# Altium PCB GR_Propu.PcbDoc
Units mil, origin at the board's own origin, x right, y up, seen from the top; angles counter-clockwise.
Board outline 3110.24 x 1811.02 mil, 2 copper layers (Top Layer, Bottom Layer); 47 components, 34 nets, 150 pads, 11 vias.
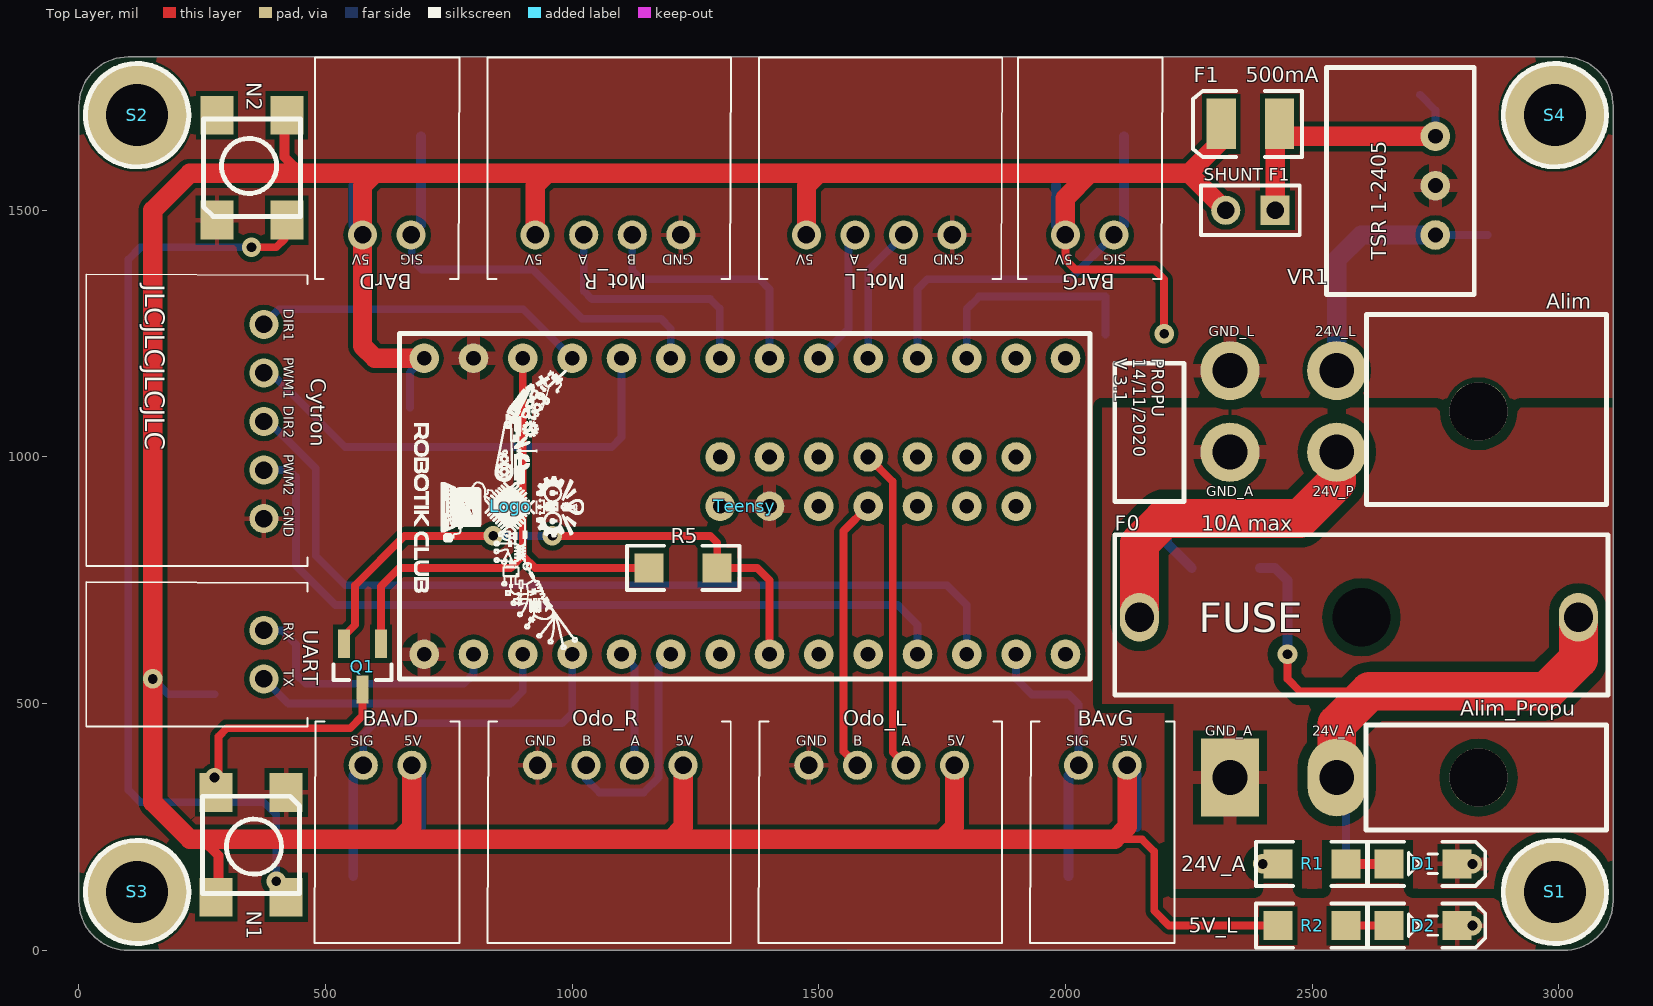
[diagram p0: Top Layer view]
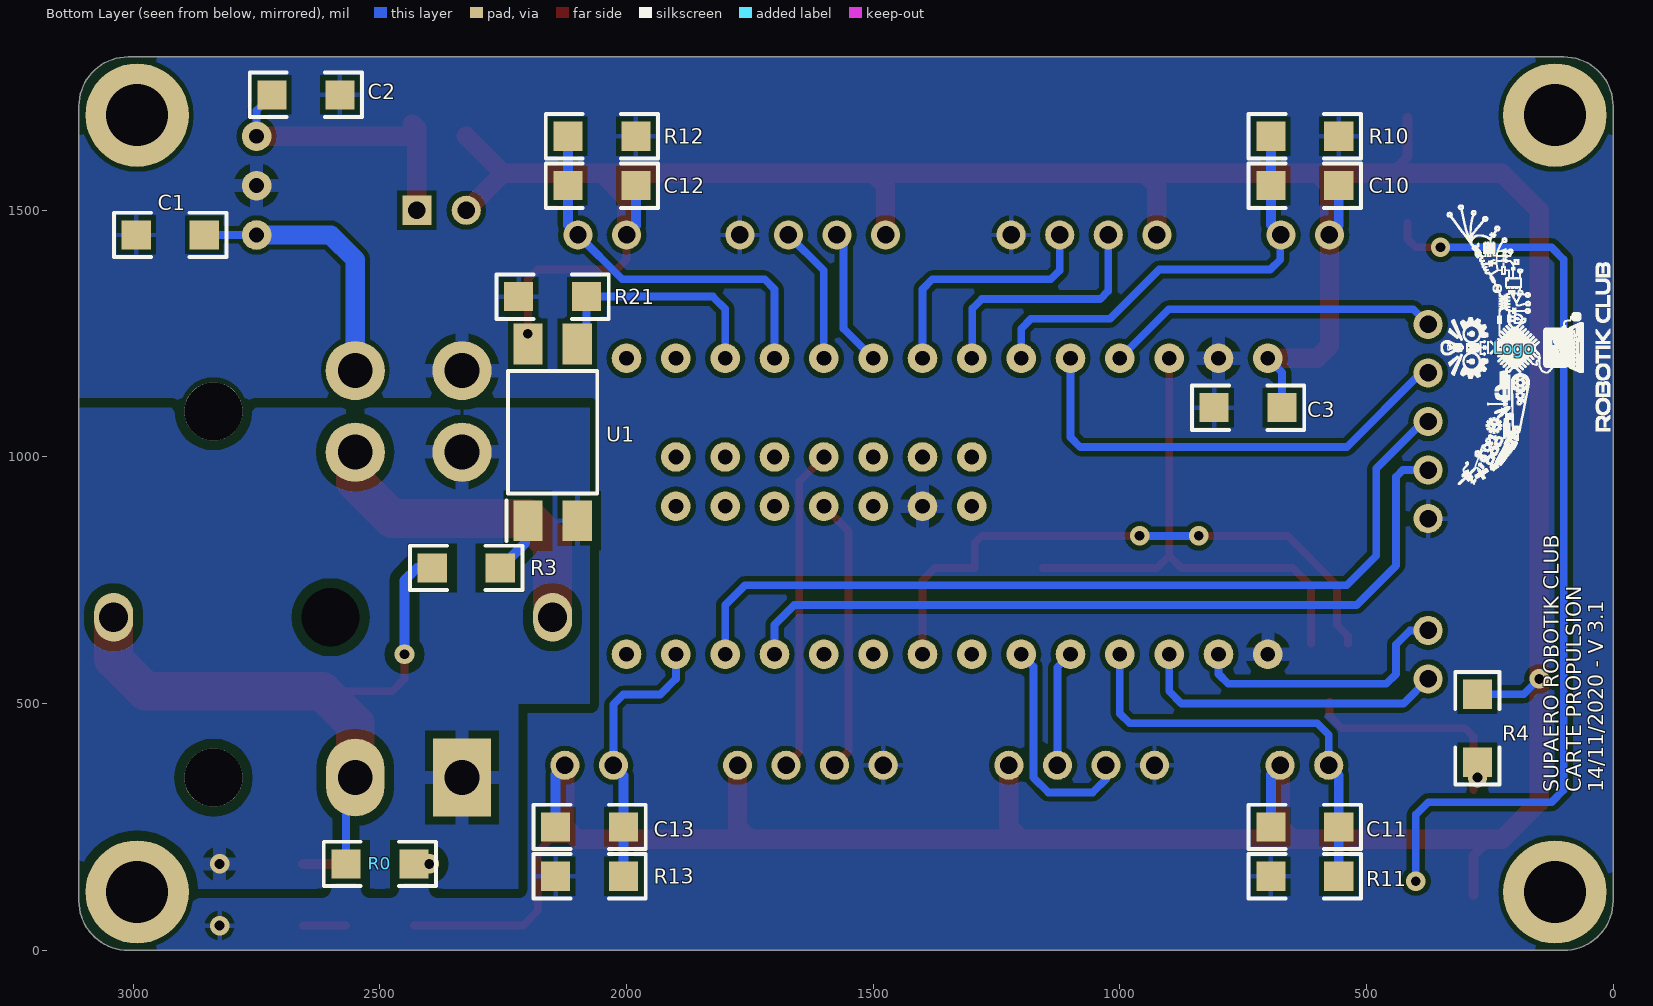
[diagram p1: Bottom Layer view, seen from below]

## Layer stack, top to bottom
Top Solder: solder mask 0.4, Solder Resist, Dk 3.5
Top Layer: signal copper 1.4
Dielectric 1: dielectric 12.6, FR-4, Dk 4.8
Bottom Layer: signal copper 1.4
Bottom Solder: solder mask 0.4, Solder Resist, Dk 3.5

## Board outline
118.11,0 100,0 cw(c100,100) 0,100 0,1259.84 0,1711.02 cw(c100,1711.02) 100,1811.02 826.77,1811.02 3010.24,1811.02 cw(c3010.24,1711.02) 3110.24,1711.02 3110.24,1181.1 3110.24,100 cw(c3010.24,100) 3010.24,0 1929.13,0

## Design rules (kind name [scope] priority, off if disabled: settings)
Clearance Clearance_GND_A [InNet('GND_A')] p1: gap=10 except(19.68: Arc-Poly Track-Poly SMDPad-Poly THPad-Poly Via-Poly Fill-Poly Poly-Poly Poly-Region Poly-Text)
Clearance [All] p2: gap=10
ComponentClearance Logo [HasFootprint('Logo_lowres')] p1: gap=0 collisioncheckmode=3 verticalgap=0 showdistances=FALSE
ComponentClearance "CMS Fuse" [HasFootprint('3.5X2.8X1.9')] p2: gap=0 collisioncheckmode=3 verticalgap=0 showdistances=FALSE
ComponentClearance [All] p3: gap=10 collisioncheckmode=3 verticalgap=10 showdistances=FALSE
HoleSize [All] p1: absolutevalues=TRUE maxlimit=125.98 minlimit=1 maxpercent=80.000 minpercent=20.000
PolygonConnect GND_A_Photo [HasFootprint('SOP254P1016X385-4N')] p1: connectstyle=Relief reliefconductorwidth=10 reliefentries=4 polygonreliefangle="90 Angle" airgapwidth=10
PolygonConnect GND_L_Power [HasFootprint('Molex_MiniFitJr_2x2H') Or HasFootprint('TRS') Or HasFootprint('Teensy')] p2: connectstyle=Relief reliefconductorwidth=27.56 reliefentries=4 polygonreliefangle="90 Angle" airgapwidth=15.75
PolygonConnect GND_A_CMS [HasFootprint('KP-3216SEC')] p3: connectstyle=Relief reliefconductorwidth=10 reliefentries=4 polygonreliefangle="90 Angle" airgapwidth=10
PolygonConnect GND_L [InNet('GND_L')] p4: connectstyle=Relief reliefconductorwidth=10 reliefentries=4 polygonreliefangle="90 Angle" airgapwidth=10
PolygonConnect GND_A [InNet('GND_A')] p5: connectstyle=Relief reliefconductorwidth=27.56 reliefentries=4 polygonreliefangle="90 Angle" airgapwidth=15.75
RoutingVias [All] p1: holewidth=28 width=50 viastyle="Through Hole" minholewidth=28 minwidth=50 maxholewidth=28 maxwidth=50
SilkToSilkClearance [All] p1 off: silktosilkclearance=10
SolderMaskExpansion [All] p1: expansion=4
Width [All] p1: maxlimit=78.74 minlimit=10 preferedwidth=15.75
27 further rules are at their usual default settings.

## Components (designator, comment, footprint, x,y, rotation, side; value= is the part's Value field where it differs from the comment)
Alim "MinifitJr 2X2H" MOLEX_MINIFITJR_2X2H 2550,1175 r90 top
Alim_Propu "MinifitJR 2H" Molex_MiniFitJr_2x1H 2550,350 r0 top
BArD "JST XH 2" S2B-XH-A 575,1450 r0 top
BArG "JST XH 2" S2B-XH-A 2000,1450 r0 top
BAvD "JST XH 2" S2B-XH-A 675,375 r180 top
BAvG "JST XH 2" S2B-XH-A 2125,375 r180 top
C1 "" "Capacitor 1206" 2925,1450 r180 bottom
C2 "(Optinal)" "Capacitor 1206" 2650,1734.06 r0 bottom
C3 "(Optinal)" "Capacitor 1206" 740,1100 r180 bottom
C10 "Cap" "Capacitor 1206" 625,1550 r180 bottom
C11 "Cap" "Capacitor 1206" 625,250 r0 bottom
C12 "Cap" "Capacitor 1206" 2050,1550 r180 bottom
C13 "Cap" "Capacitor 1206" 2075,250 r0 bottom
Cytron "JST XH 5" S5B-XH-A 375,875 r90 top
D1 "A" KP-3216SEC 2725,175 r0 top
D2 "L" KP-3216SEC 2725,50 r0 top
F0 "10A max" Fuse 2150,675 r0 top
F1 "500mA" 3.5X2.8X1.9 2375,1675 r180 top
Logo "Comment" Logo_lowres 200,1220 r90 bottom
Logo "Comment" Logo_lowres 875,900 r270 top
Mot_L "JST XH 4" S4B-XH-A 1475,1450 r0 top
Mot_R "JST XH 4" S4B-XH-A 925,1450 r0 top
N1 "WS2812C" WS2812C 420,320 r270 top
N2 "WS2812C" WS2812C 280,1480 r90 top
Odo_L "JST XH 4" S4B-XH-A 1775,375 r180 top
Odo_R "JST XH 4" S4B-XH-A 1225,375 r180 top
Q1 "MOSFET-N" SOT23_M 575,575 r270 top
R0 "Res2" "Resistor 1206" 2500,175 r180 bottom
R1 "Res2" "Resistor 1206" 2500,175 r0 top
R2 "Res2" "Resistor 1206" 2500,50 r0 top
R3 "Res2" "Resistor 1206" 2325,775 r0 bottom
R4 "Res2" "Resistor 1206" 275,450 r90 bottom
R5 "Res2" "Resistor 1206" 1225,775 r180 top
R10 "Res2" "Resistor 1206" 625,1650 r180 bottom
R11 "Res2" "Resistor 1206" 625,150 r0 bottom
R12 "Res2" "Resistor 1206" 2050,1650 r180 bottom
R13 "Res2" "Resistor 1206" 2075,150 r0 bottom
R21 "Res2" "Resistor 1206" 2150,1325 r180 bottom
S1 "Screw M3" "Screw M3" 2992.13,118.11 r0 top
S2 "Screw M3" "Screw M3" 118.11,1692.91 r0 top
S3 "Screw M3" "Screw M3" 118.11,118.11 r0 top
S4 "Screw M3" "Screw M3" 2992.13,1692.91 r0 top
"SHUNT F1" "Header 2" HDR1X2 2425,1500 r180 top
Teensy "Teensy 3.2" TEENSY 1500,500 r90 top locked
U1 "FOD817S" SOP254P1016X385-4N 2150,1050 r90 bottom
UART "JST XH 2" S2B-XH-A 375,550 r90 top
VR1 "TSR 1-2405" TRS 2750,1450 r270 top

## Footprints (in the part's own frame and the unit in brackets; to place one, negate y for a bottom-side part, rotate by r counter-clockwise, add the part's x,y. Pads: shape width x height; smd on the part's side, far side on the other; paste and mask are expansions set on the pad)
3.5X2.8X1.9 [mm] "SM LED; 2 C-Bend Leads; Body 3.5 x 2.8 x 1.9 mm, inc leads (LxWxH typ)"
  rect 1.5x2.6 smd: 1(-1.5,0) 2(1.5,0)
  silkscreen extent -2.65,-1.7 2.95,1.7
"Capacitor 1206" [mm]
  rect 1.5x1.5 smd: 1(-1.75,0) 2(1.75,0)
  silkscreen extent -2.89,-1.14 2.89,1.14, body extent -1.98,-0.99 1.98,0.96, height 1.3
Fuse [mm] "Porte-fusible monté sur circuit 10 (UL) A, 6.3 (VDE) A, fusible Cartouche, 893-0574"
  round 2 hole 3: 0(11.43,0)
  oval 2x2.5 hole 1.5: 1(0,0) 2(22.6,0)
  silkscreen extent -1.27,-4 24.13,4.25, body extent -1.27,-4.29 24.13,4.29, height 11.41
HDR1X2 [mm] "Connector; Header; 2 Position"
  rect 1.5x1.5 hole 0.9: 1(0,0)
  round 1.5 hole 0.9: 2(2.54,0)
  silkscreen extent -1.27,-1.27 3.81,1.27
KP-3216SEC [mm]
  rect 1.5x1.5 smd: 1(-1.75,0) 2(1.75,0)
  silkscreen extent -2.89,-1.14 3.2,1.14, body extent -1.7,-0.79 1.5,0.81, height 1.1
Logo_lowres [mil]
  silkscreen extent -276,-194 291,148
Molex_MiniFitJr_2x1H [mm] "Connecteur Molex 2"
  rect 3x4 hole 1.8: 1(-5.5,0)
  oval 3x4 hole 1.8: 2(0,0)
  round 3 hole 3 unplated: 3(7.3,0)
  silkscreen extent 1.5,-2.7 13.9,2.7, body extent -6.03,-2.7 13.9,3.1, height 11.01
MOLEX_MINIFITJR_2X2H [mm] "MOLEX_MINIFITJR_3X2, 39-30-1060"
  round 3.048 hole 1.8: 1(-4.2,5.5) 2(-4.2,0) 3(0,5.5) 4(0,0)
  round 3 hole 3 unplated: 10(-2.1,-7.3)
  silkscreen extent -6.9,-13.9 2.9,-1.52, body extent -6.88,-13.9 3.12,6.03, height 11.4
"Resistor 1206" [mm]
  rect 1.5x1.5 smd: 1(-1.75,0) 2(1.75,0)
  silkscreen extent -2.89,-1.14 2.89,1.14, body extent -1.98,-0.95 1.98,0.93, height 0.55
S2B-XH-A [mm]
  round 1.5 hole 0.9: 1(0,0) 2(2.5,0)
  silkscreen extent -2.45,-2.26 5,9.14, body extent -2.41,-2.32 4.99,9.18, height 6.15
S4B-XH-A [mm]
  round 1.5 hole 0.9: 1(0,0) 2(2.5,0) 3(5,0) 4(7.5,0)
  silkscreen extent -2.45,-2.26 10.08,9.14, body extent -2.44,-2.32 9.96,9.18, height 6.15
S5B-XH-A [mm]
  round 1.5 hole 0.9: 1(0,0) 2(2.5,0) 3(5,0) 4(7.5,0) 5(10,0)
  silkscreen extent -2.45,-2.26 12.58,9.14, body extent -2.45,-2.3 12.45,9.2, height 6.15
"Screw M3" [mm] "M3 iso Screw"
  round 5.32 hole 3.2 unplated: 0(0,0)
  silkscreen extent -2.66,-2.66 2.66,2.66
SOP254P1016X385-4N [mm]
  rect 2.1x1.5 smd: 1(-4.55,1.27) 2(-4.55,-1.27) 3(4.55,-1.27) 4(4.55,1.27)
  silkscreen extent -5.6,-2.3 3.15,2.37, body extent -3.53,-1.4 3.48,1.44, height 2.21
SOT23_M [mm] "SOT23, 3-Leads, Body 2.9x1.3mm, Pitch 0.95mm, Lead Span 2.3mm - Reverse Pinning, IPC Low Density"
  rect 1.45x0.6 smd: 1(1.175,0) 2(-1.175,-0.95) 3(-1.175,0.95)
  silkscreen extent -0.1,-1.5 0.7,1.5, body extent -0.7,-1.5 0.7,1.5, height 1.1
TEENSY [mil] "Teensy 3.2"
  round 60 hole 30: 0(100,700) 1(100,600) 2(100,500) 3(100,400) 4(100,300) 5(100,200) 6(100,100) 7(100,0) 8(100,-100) 9(100,-200) 10(100,-300) 11(100,-400) 12(100,-500) 13(700,-500) 14(700,-400) 15(700,-300) 16(700,-200) 17(700,-100) 18(700,0) 19(700,100) 20(700,200) 21(700,300) 22(700,400) 23(700,500) 24(400,0) 25(400,-100) 26(400,-200) 27(400,-300) 28(400,-400) 29(500,-400) 30(500,-300) 31(500,-200) 32(500,-100) 33(500,0) 36(400,200) 37(500,200) 39(500,100) 40(400,100) 41(700,600) 42(700,700) 43(700,800) 44(100,800)
  silkscreen extent 50,-550 750,850, body extent 48,-550 752,907, height 505
TRS [mil]
  round 60 hole 30: 1(0,0) 2(-100,0) 3(-200,0)
  silkscreen extent -340,-220 121,79, body extent -341,-218 120,80, height 398
WS2812C [mm]
  rect 2x1.7 smd: 1(5.4,-3.6) 2(5.4,0) 3(0,0) 4(0,-3.6)
  silkscreen extent 0.2,-4.3 5.2,0.7, body extent 0.19,-4.33 5.19,0.67, height 2

## Part data
Alim: library part "Header 2X2H", "Header, 2-Pin, Dual row, Right Angle"
Alim_Propu BArD BArG BAvD BAvG UART: library part "Header 2", "Header, 2-Pin"
C1 C2 C3: library part Cap, "Capacitor"
C10 C11 C12 C13: "Capacitor"
Cytron: library part "Header 5", "Header, 5-Pin"
D1 D2: library part LED2, "Typical RED, GREEN, YELLOW, AMBER GaAs LED"
F0: library part "Fuse 2", "Main Fuse"
F1: library part "Fuse 2", "Fuse"
Mot_L Mot_R Odo_L Odo_R: library part "Header 4H", "Molex SPOX 4x1H"
N1 N2: "Intelligent control LED"
Q1: "N-Channel MOSFET"
R0 R1 R2 R3 R4 R5 R10 R11 R12 R13 R21: "Resistor"
"SHUNT F1": "Header, 2-Pin"
Teensy: library part teensy3.2
U1: library part Optoisolator1, "4-Pin Phototransistor Optocoupler"
VR1: library part "Volt Reg", "Voltage Regulator"

## Via types
v1: diameter 39.37, hole 19.68, Top Layer to Bottom Layer, 10 vias
v2: diameter 40, hole 20, Top Layer to Bottom Layer, 1 vias

## Nets (pads, with @x,y where several pads share a name; then routed paths per layer and width w, separated by ;. In a path a pad name is that pad's centre, name@x,y a point inside that pad or via, vN(x,y) a via of type N, cw(c..) or ccw(c..) an arc to the next point about the centre after c; other vN are vias at no path point)
3V_L: Q1.3 R5.2 Teensy.41 | length 1096.2
  Top Layer w15.75: Q1.3 612.4,737.6 649.8,775 875,775 900,800 ; Teensy.41 900,800 ; R5.2 925,775 900,800
5V_L: "SHUNT F1.2" BArD.1 BArG.1 BAvD.1 BAvG.1 C3.2 C10.2 C11.2 C12.2 C13.2 F1.2 Mot_L.1 Mot_R.1 N1.1 N2.1 Odo_L.1 Odo_R.1 R2.1 R4.2 Teensy.43 U1.4 | length 8912.2
  Top Layer w15.75: BArG.1 2000,1400 2020,1380 2180,1380 2200,1360 v1(2200,1250) ; 2100,225 2155,225 2180,200 2180,80 2210,50 R2.1
  Top Layer w20: 250,225 283.27,191.73 N1.1@283.27,112.4 ; N2.1@416.73,1687.6 416.73,1608.27 450,1575
  Top Layer w39.37: BAvD.1 675,250 650,225 ; Teensy.43 600,1200 575,1225 BArD.1 575,1550 600,1575 ; Mot_R.1 925,1550 950,1575 ; Odo_R.1 1225,250 1200,225 ; Mot_L.1 1475,1550 1500,1575 ; Odo_L.1 1775,250 1750,225 ; BArG.1 2000,1525 2050,1575 ; BAvG.1 2125,250 2100,225 1750,225 ; 2325,1500 2250,1575 ; F1.2@2325,1650 2250,1575 ; 600,1575 450,1575 225,1575 150,1500 150,300 225,225 250,225 650,225 ; 600,1575 950,1575 ; 650,225 1200,225 ; 950,1575 1500,1575 ; 1200,225 1750,225 ; 1500,1575 2050,1575 ; 2050,1575 2250,1575
  Bottom Layer w15.75: v1(150,550) 181.1,518.9 R4.2 ; C3.2 671.1,1171.1 Teensy.43
  Bottom Layer w20: C10.2 556.1,1468.9 BArD.1 ; BAvD.1 693.9,356.1 C11.2 ; C12.2 1981.1,1468.9 BArG.1 ; BAvG.1 2143.9,356.1 C13.2
24V_A: Alim_Propu.2 F0.2 R0.1 R3.2 | length 1420.1
  Top Layer w15.75: v2(2450,600) 2450,550 2475,525 2616.54,525 ; Alim_Propu.2@2550,293.9 Alim_Propu.2
  Top Layer w78.74: Alim_Propu.2 2550,458.46 2616.54,525 2975,525 3039.76,589.76 F0.2
  Bottom Layer w15.75: Alim_Propu.2 2568.9,331.1 R0.1
  Bottom Layer w20: R3.2 2425,775 2450,750 v2(2450,600)
24V_L: Alim.4 C1.2 VR1.1 | length 551.8
  Bottom Layer w15.75: VR1.1 C1.2
  Bottom Layer w39.37: Alim.4 2550,1400 2600,1450 VR1.1
24V_P: Alim.2 F0.1 | length 661.4
  Top Layer w78.74: F0.1 2150,825 2200,875 2475,875 2550,950 Alim.2
GND_A: Alim.1 Alim_Propu.1 D1.2 U1.2
  other v1: 2825,175
GND_L: Alim.3 C1.1 C2.1 C3.1 Cytron.1 D2.2 Mot_L.4 Mot_R.4 N1.3 N2.3 Odo_L.4 Odo_R.4 R10.2 R11.2 R12.2 R13.2 R21.1 Teensy.40 Teensy.42 Teensy.44 VR1.2
  other v1: 2825,50
NetC2_2: "SHUNT F1.1" C2.2 F1.1 VR1.3 | length 600.7
  Top Layer w39.37: 2425,1500 2425,1665.94 F1.1 ; F1.1@2425,1650 VR1.3
  Bottom Layer w15.75: C2.2 2750,1702.95 VR1.3
NetD1_1: D1.1 R1.2 | length 87.2
  Top Layer w20: R1.2 D1.1
NetD2_1: D2.1 R2.2 | length 87.2
  Top Layer w15.75: R2.2 D2.1
NetN1_2: N1.2 N2.4 | length 1898
  Top Layer w15.75: v1(350,1425) 400,1425 416.73,1441.73 N2.4@416.73,1475
  Bottom Layer w15.75: v1(350,1425) 125,1425 100,1400 100,325 125,300 375,300 400,275 v1(400,140)
NetN1_4: N1.4 Q1.1 R4.1 | length 446
  Top Layer w15.75: N1.4@283.27,325 283.27,433.27 300,450 550,450 575,475 Q1.1@575,503.74
  other v1: 275,350
NetR0_2: R0.2 R1.1
  other v1: 2400,175
NetR3_1: R3.1 U1.1 | length 119.1
  Bottom Layer w20: U1.1 2206.1,864.76 2206.1,825 R3.1
T_BUMP_ARD: BArD.2 C10.1 R10.1 Teensy.21 | length 902.1
  Bottom Layer w15.75: BArD.2 675,1448.43 675,1400 695,1380 920,1380 1020,1280 1180,1280 1200,1260 Teensy.21
  Bottom Layer w20: BArD.2 693.9,1470.47 C10.1 R10.1
T_BUMP_ARG: BArG.2 C12.1 R12.1 Teensy.16 | length 792.5
  Bottom Layer w15.75: Teensy.16 1700,1340 1720,1360 2008.43,1360 BArG.2
  Bottom Layer w20: BArG.2 2118.9,1470.47 C12.1 R12.1
T_BUMP_AVD: BAvD.2 C11.1 R11.1 Teensy.2 | length 856.5
  Bottom Layer w15.75: BAvD.2 576.57,436.57 600,460 980,460 1000,480 Teensy.2
  Bottom Layer w20: R11.1 C11.1 556.1,354.53 BAvD.2
T_BUMP_AVG: BAvG.2 C13.1 R13.1 Teensy.11 | length 554.8
  Bottom Layer w15.75: Teensy.11 1900,550 1931.64,518.36 2006.64,518.36 2026.57,498.43 BAvG.2
  Bottom Layer w20: R13.1 C13.1 2006.1,354.53 BAvG.2
T_DIR_1: Cytron.5 Teensy.23 | length 678.7
  Bottom Layer w15.75: Cytron.5 405.51,1299.21 900.79,1299.21 Teensy.23
T_DIR_2: Cytron.3 Teensy.10 | length 1782.5
  Bottom Layer w15.75: Cytron.3 384.84,1071.85 480,976.69 480,800 540,740 1760,740 1800,700 Teensy.10
T_MOT_L_A: Mot_L.2 Teensy.18 | length 280.4
  Bottom Layer w15.75: Teensy.18 1560,1260 1560,1436.57 Mot_L.2
T_MOT_L_B: Mot_L.3 Teensy.17 | length 279.8
  Bottom Layer w15.75: Teensy.17 1600,1378.15 Mot_L.3
T_MOT_R_A: Mot_R.2 Teensy.20 | length 504.1
  Bottom Layer w15.75: Mot_R.2 1023.43,1336.57 1040,1320 1280,1320 1299.25,1300.75 Teensy.20@1299.25,1200.75
T_MOT_R_B: Mot_R.3 Teensy.19 | length 505.8
  Bottom Layer w15.75: Mot_R.3 1121.85,1378.15 1140,1360 1380,1360 1400,1340 Teensy.19
T_NEOPIXEL: Q1.2 R5.1 Teensy.6 | length 1226.7
  Top Layer w15.75: Q1.2 537.6,637.6 560,660 560,740 660,840 v1(840,840) ; v1(960,840) 1280,840 1293.9,826.1 R5.1 1375,775 1400,750 Teensy.6
  Bottom Layer w15.75: v1(840,840) v1(960,840)
T_ODO_L_A: Odo_L.2 Teensy.32 | length 656.7
  Top Layer w15.75: Teensy.32 1650,950 1650,401.57 Odo_L.2
T_ODO_L_B: Odo_L.3 Teensy.25 | length 557.4
  Top Layer w15.75: Odo_L.3 1550,403.15 1550,850 Teensy.25
T_ODO_R_A: Odo_R.2 Teensy.3 | length 236
  Bottom Layer w15.75: Teensy.3 1126.57,573.43 Odo_R.2
T_ODO_R_B: Odo_R.3 Teensy.4 | length 458.9
  Bottom Layer w15.75: Odo_R.3 1028.15,346.85 1055,320 1145,320 1175,350 1175,575 Teensy.4
T_PWM_1: Cytron.4 Teensy.22 | length 955.5
  Bottom Layer w15.75: Cytron.4 389.72,1170.28 540,1020 1080,1020 1100,1040 Teensy.22
T_PWM_2: Cytron.2 Teensy.9 | length 1620.3
  Bottom Layer w15.75: Cytron.2 426.57,973.43 440,960 440,780 520,700 1660,700 1700,660 Teensy.9
T_RX1: Teensy.0 UART.2 | length 553.3
  Bottom Layer w15.75: UART.2 411.57,648.43 440,620 440,560 460,540 780,540 800,560 Teensy.0
T_SENSE_PROPU: R21.2 Teensy.15 U1.3 | length 468.4
  Bottom Layer w15.75: Teensy.15 1800,1300 1825,1325 R21.2 U1.3@2081.1,1248.03
T_TX1: Teensy.1 UART.1 | length 631.1
  Bottom Layer w15.75: UART.1 425,500 875,500 900,525 Teensy.1
pads on no net: Alim.10 Alim_Propu.3 F0.0 N2.2 S1.0 S2.0 S3.0 S4.0 Teensy.5 Teensy.7 Teensy.8 Teensy.12 Teensy.13 Teensy.14 Teensy.24 Teensy.26 Teensy.27 Teensy.28 Teensy.29 Teensy.30 Teensy.31 Teensy.33 Teensy.36 Teensy.37 Teensy.39

## Polygon pours and split planes (outlines as drawn)
GND_A on Bottom Layer "Bot GND_A" (solid, remove dead copper, pour order 2): 3110.24,1100 2075,1100 2075,500 2220,500 2220,125 3110.24,125
GND_L on Bottom Layer "Bot GND_L" (solid, remove dead copper, pour order 4): 0,0 3110.24,0 3110.24,1732.28 3031.5,1811.02 0,1811.02
GND_L on Top Layer "Top GND_L" (solid, pour order 5): 0,118.11 120.16,2.05 2992.13,0 3110.24,118.11 3110.24,1692.91 2992.13,1811.02 118.11,1811.02 0,1692.91
GND_A on Top Layer "Top GND_A" (solid, remove dead copper, pour order 3): 3110.24,1100 2075,1100 2075,500 2220,500 2220,125 3110.24,125

## Silkscreen, mask and mechanical layers (free items; w line width, h text height)
Top Overlay:
  lines w10: 2100,910 2240,910 2240,1190 2100,1190 2100,910
  text "5V" at 590,1410 h20 r180
  text "SIG" at 698.43,1410 h20 r180
  text "5V" at 940,1410 h20 r180
  text "A" at 1031.57,1410 h20 r180
  text "B" at 1130,1410 h20 r180
  text "GND" at 1245.28,1410 h20 r180
  text "5V" at 1490,1410 h20 r180
  text "A" at 1581.57,1410 h20 r180
  text "B" at 1680,1410 h20 r180
  text "GND" at 1795.28,1410 h20 r180
  text "5V" at 2015,1410 h20 r180
  text "SIG" at 2123.43,1410 h20 r180
  text "JLCJLCJLCJLC" at 135,1350 h39.37 r270
  text "DIR1" at 415,1300.28 h20 r270
  text "GND_L" at 2290,1245 h20
  text "24V_L" at 2506.54,1245 h20
  text "PWM1" at 415,1201.85 h20 r270
  text "PROPU / 14/11/2020 / V 3.1" at 2100,1200 h25 r270
  text "DIR2" at 415,1103.43 h20 r270
  text "PWM2" at 415,1005 h20 r270
  text "GND_A" at 2285,920 h20
  text "24V_P" at 2501.54,920 h20
  text "GND" at 415,900 h20 r270
  text "RX" at 415,665 h20 r270
  text "TX" at 415,570 h20 r270
  text "GND_A" at 2283.46,435 h20
  text "24V_A" at 2500,435 h20
  text "SIG" at 551.57,415 h20
  text "5V" at 660,415 h20
  text "GND" at 904.72,415 h20
  text "B" at 1020,415 h20
  text "A" at 1118.43,415 h20
  text "5V" at 1210,415 h20
  text "GND" at 1454.72,415 h20
  text "B" at 1570,415 h20
  text "A" at 1668.43,415 h20
  text "5V" at 1760,415 h20
  text "SIG" at 2001.57,415 h20
  text "5V" at 2110,415 h20
  text "24V_A" at 2235,160 h30
  text "5V_L" at 2250,35 h30
Bottom Overlay:
  text "SUPAERO ROBOTIK CLUB / CARTE PROPULSION / 14/11/2020 - V 3.1" at 20,320 h30 r270
Mechanical 2:
  lines w10: 0,118.11 ccw(c118.11,118.11) 118.11,0 2992.13,0 ccw(c2992.13,118.11) 3110.24,118.11 3110.24,1692.91 ccw(c2992.13,1692.91) 2992.13,1811.02 118.11,1811.02 ccw(c118.11,1692.91) 0,1692.91 0,118.11

## Dimensions
0,100 to 3110.24,100 on Mechanical 15
118.11,0 to 826.77,1811.02 on Mechanical 15

## Text inside footprints (layer, text, board x,y; h text height)
F0: Top Overlay "FUSE" at 2270,645 h60